# EAGLE board mini (EAGLE 9.6.2)
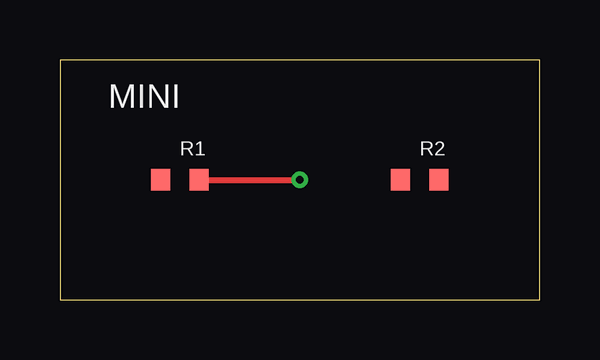
[diagram p0: board, top side]
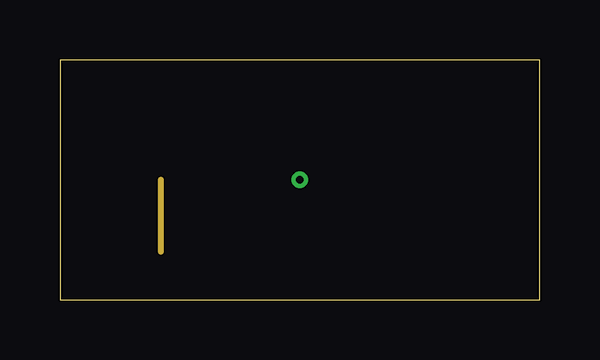
[diagram p1: board, inner layer Route2]
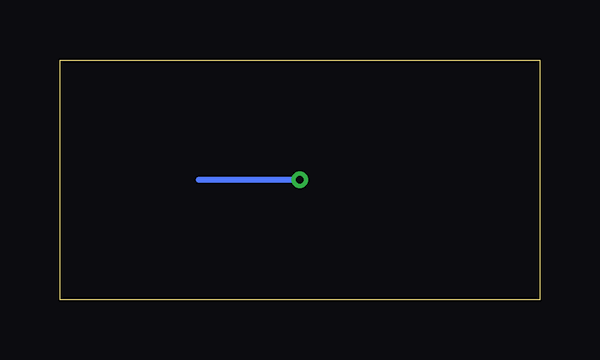
[diagram p2: board, bottom side, seen from below]

Size 20 x 10 mm. Coordinates in mm from the lower left corner, seen from the top.
Outline: 0,0 20,0 20,10 0,10 0,0
Copper layers used: Top, Route2, Bottom

## Footprints (pad centres in the part's own frame; a part is rotated, then mirrored left to right if it is on the bottom)
R0603 = smd 0.8 x 0.9: 1 -0.8,0; 2 0.8,0

## Placement (x,y rotation side)
R1  1k  [R0603]  5,5 0 top
R2  1k  [R0603]  15,5 0 top

## Library data of the parts
R1 R2 = t

## Nets
A: R1.2 R2.1
B: R1.1

## Tracks (layer width: path | path; a pad name or v marks a point on that pad's centre or on a via)
A  (via drill 0.3)
  Top 0.25: R1.2 v10,5
  Bottom 0.25: v10,5 R2.1
B
  Route2 0.25: R1.1 4.2,2

## Text on the board
tPlace: MINI